# Altium PCB OpenRex_V1I1_PCB.PcbDoc (part 2 of 12)
Units mm, origin at the board's own origin, x right, y up, seen from the top; angles counter-clockwise.
Board outline 70 x 95 mm, 10 copper layers (L1, L2, L3, L4 (PWR), L5 (PWR), L6 (PWR), L7 (PWR), L8, L9, L10), stack 1.632 mm thick; 1080 components, 708 nets, 3831 pads, 2373 vias.
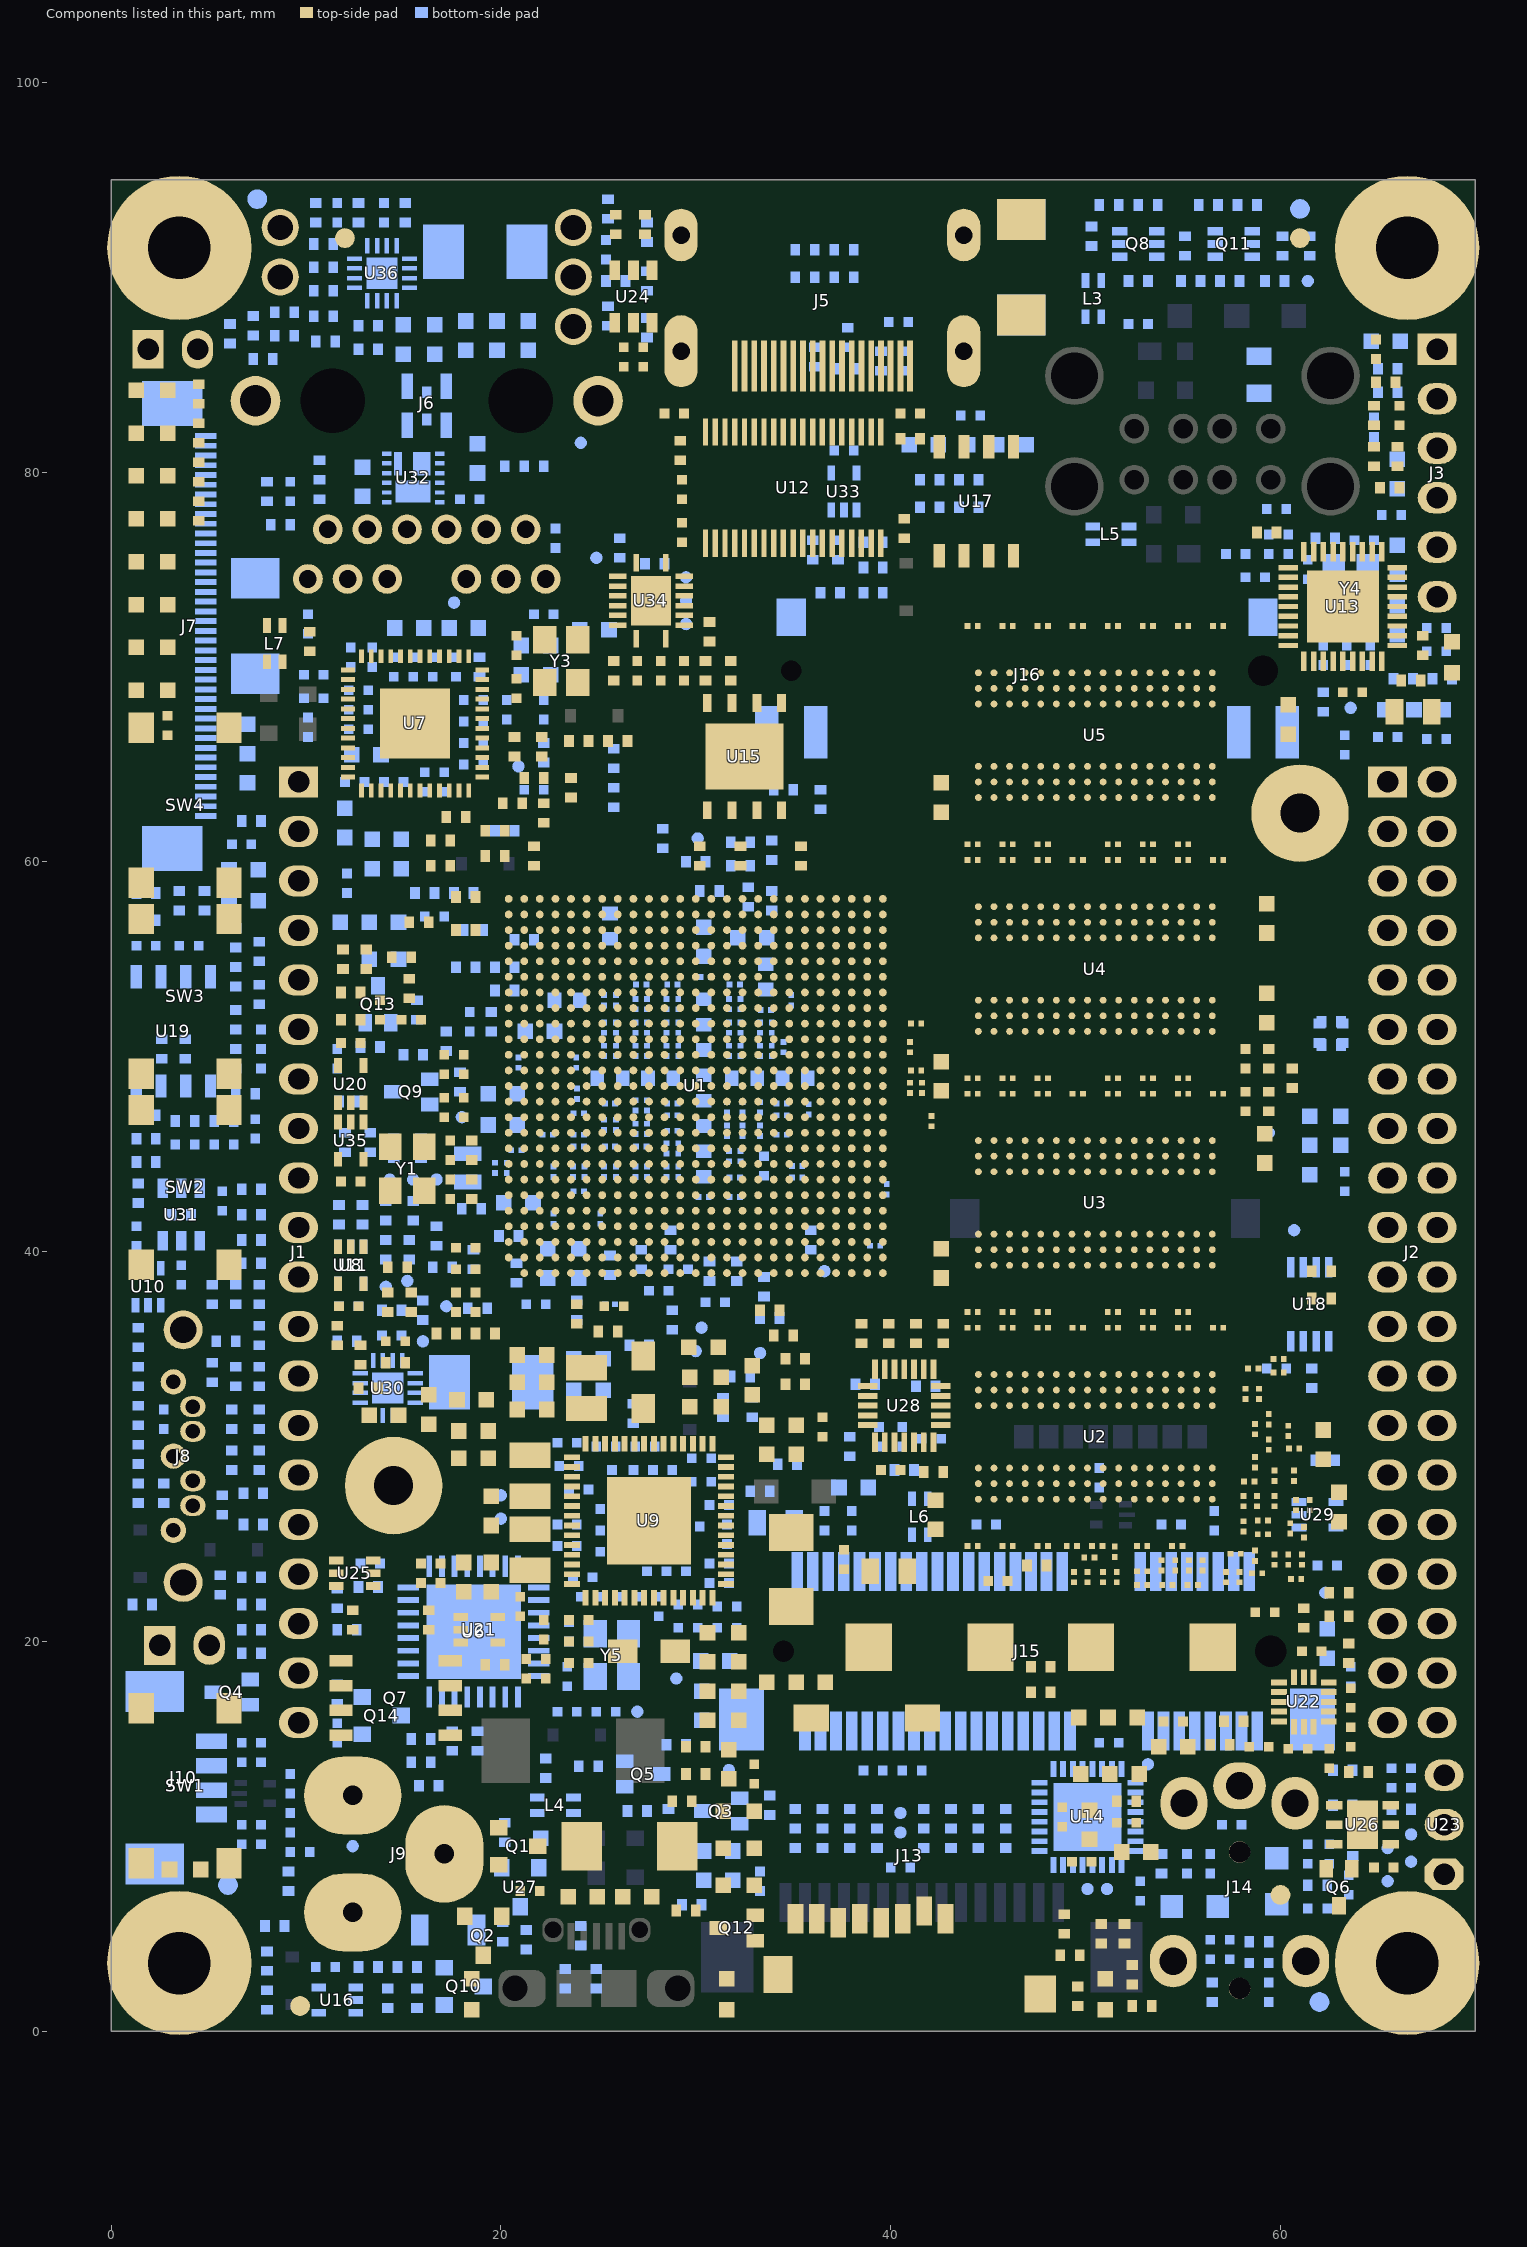
[diagram p10: the components of this part, seen from the top]

## Components (designator, comment, footprint, x,y, rotation, side; value= is the part's Value field where it differs from the comment) (continued)
L7 "ACM2012-900-2P-T002" ACM2012 8.4,71.2 r90 top
L8 "1u / 2.6A" IFSC_79MILX98MIL 24.4,33 r270 top
L9 "1u / 2.6A" IFSC_79MILX98MIL 21.5,28.5 r90 top
L10 "1u / 2.6A" IFSC_79MILX98MIL 21.5,24.7 r270 top
L11 "2u2 / 2.75A" IHLP_160MILX175MIL 34.9,23.7 r90 top
L12 "1u" IHLP_204MILX216MIL 19.5,33.3 r0 bottom locked
L13 "1u" IHLP_204MILX216MIL 19.2,91.3 r0 bottom
MH1 "MH_7.4MMC_3.2MMD" MH_7.4MMD_3.2MMD 3.5,3.5 r0 top locked
MH2 "MH_7.4MMC_3.2MMD" MH_7.4MMD_3.2MMD 66.5,3.5 r0 top locked
MH3 "MH_7.4MMC_3.2MMD" MH_7.4MMD_3.2MMD 66.5,91.5 r0 top locked
MH4 "MH_7.4MMC_3.2MMD" MH_7.4MMD_3.2MMD 3.5,91.5 r0 top locked
MH5 "MH_5MMC_2MMD" MH_5MMD_2MMD 14.5,28 r0 top locked
MH6 "MH_5MMC_2MMD" MH_5MMD_2MMD 61,62.5 r0 top locked
Q1 "DMP2035U-7" SOT-23-3-123 20.9,9.5 r0 top
Q2 "DMP2035U-7" SOT-23-3-123 19.1,4.9 r270 top
Q3 "2N7002BKW,115" SC70_SOT323 31.3,11.3 r180 bottom
Q4 "2N7002BKW,115" SC70_SOT323 6.2,17.4 r180 bottom
Q5 "2N7002BKW,115" SC70_SOT323 27.3,13.2 r0 bottom
Q6 "2N7002BKW,115" SC70_SOT323 63,7.4 r270 top
Q7 "SI4425BDY-T1-E3" 8_SOIC_3.9MM 14.6,17.1 r0 top
Q8 "2N7002BKS,115" SOT363 52.7,91.7 r0 bottom
Q9 "2N7002BKW,115" SC70_SOT323 15.4,48.2 r180 bottom
Q10 "MMBT3906,215" SOT-23-3-123 18.1,2.3 r0 bottom
Q11 "2N7002BKS,115" SOT363 57.6,91.7 r0 bottom
Q12 "2N7002BKW,115" SC70_SOT323 32.1,5.3 r180 top
Q13 "2N7002BKW,115" SC70_SOT323 13.7,52.7 r90 bottom
Q14 "MMBT3906,215" SOT-23-3-123 13.9,16.2 r0 bottom
R1 "47R" R0201 60.4,24.2 r270 top
R2 "47R" R0201 57.9,23.3 r90 top
R3 "47R" R0201 60.7,28.5 r270 top
R4 "240R" R0201 49.6,36.1 r0 top
R5 "240R" R0201 49.6,48.1 r0 top
R6 "10k" R0201 35.8,47.3 r90 bottom
R7 "10k" R0201 39.8,43.2 r270 bottom
R8 "240R" R0201 49.6,60.1 r0 top
R9 "240R" R0201 49.6,72.1 r0 top
R10 "240R" R0201 41.3,51.7 r0 top
R11 "47R" R0201 56,23.9 r270 top
R12 "47R" R0201 59.7,28.5 r270 top
R13 "0R" R0402 23.9,37 r90 bottom
R14 "0R" R0402 20.4,40.8 r0 bottom
R15 "10k" R0402 32.3,61 r0 bottom
R16 "49R9" R0402 19.2,35.8 r180 top
R17 "49R9" R0402 17.2,35.8 r0 top
R18 "0R" R0402 25.6,39.3 r90 bottom
R19 "0R" R0402 19.5,51.8 r270 bottom
R20 "2M2" R0402 18.5,45.2 r90 top
R21 "47k" R0402 39.1,73.8 r0 bottom
R22 "47R" R0201 59.7,24.2 r270 top
R23 "1k6" R0402 36,76 r90 bottom
R24 "0R" R0402 25.5,35.9 r0 top
R25 "0R" R0402 35.1,33.2 r180 top
R26 "0R" R0402 23.9,36.8 r270 top
R27 "0R" R0402 28.7,40.6 r90 bottom
R28 "4k99" R0402 37.9,30 r270 bottom
R29 "0R" R0402 30.7,39 r90 bottom
R30 "1k" R0402 20.7,65.9 r90 top
R31 "47R" R0201 59.1,26.2 r180 top
R32 "1k6" R0201 25.6,37.3 r0 bottom
R33 "0R" R0402 39.3,9.9 r90 bottom
R34 "47R" R0201 52.9,23.6 r0 top
R35 "22R" R0402 21.2,56 r180 bottom
R36 "0R" R0402 35.9,40.6 r90 bottom
R37 "200R" R0402 20.8,38.9 r90 bottom
R38 "47R" R0201 58.7,24.4 r270 top
R39 "47R" R0201 57.2,23.3 r90 top
R40 "47R" R0201 61.2,25.6 r90 top
R41 "0R" R0402 2.6,50.4 r270 bottom
R42 "47R" R0201 52.9,22.9 r0 top
R43 "22R" R0402 21.7,60.3 r90 top
R44 "47R" R0201 59.7,27.2 r90 top
R45 "47R" R0201 51.5,24.6 r270 top
R46 "0R" R0402 29.2,81.1 r90 top
R47 "15k" R0402 41,81.7 r180 top
R48 "10k" R0402 13.3,45.6 r90 bottom
R49 "10k" R0402 15.4,37.4 r270 top
R50 "47R" R0201 59.4,31.4 r270 top
R51 "0R" R0402 14.7,39.2 r180 top
R52 "10k" R0402 48.9,5.5 r270 top
R53 "10k" R0402 49.2,3.9 r180 top
R54 "10k" R0402 50.8,5 r90 top
R55 "4k99" R0201 24,47.1 r0 bottom
R56 "4k99" R0201 22.4,46 r0 bottom
R57 "10k" R0402 32.3,59.8 r180 bottom
R58 "10k" R0402 15.9,45.3 r270 bottom
R59 "10k" R0402 1.4,33.6 r90 bottom
R60 "0R" R0402 51.2,93.7 r180 bottom
R61 "1k" R0201 25.1,41.7 r90 bottom
R62 "10k" R0402 16,37 r270 bottom
R63 "10k" R0402 18.6,39.6 r270 bottom
R64 "10k" R0402 17,39.2 r0 bottom
R65 "0R" R0402 39.3,10.9 r270 bottom
R66 "47R" R0201 59.1,25.5 r180 top
R67 "0R" R0402 47.7,18.7 r180 top
R68 "10k" R0402 11.7,41.9 r90 bottom
R69 "10k" R0402 12.9,41.9 r90 bottom
R70 "0R" R0402 14.2,37.4 r90 top
R71 "0R" R0402 37.9,9.9 r90 bottom
R72 "47R" R0201 58.7,30.9 r270 top
R73 "100k" R0402 7.3,26 r180 bottom
R74 "0R" R0402 33.9,58 r90 bottom
R75 "10k" R0402 24,66.2 r180 top
R76 "0R" R0402 32.1,39 r270 bottom
R77 "47R" R0201 51.6,23.3 r90 top
R78 "0R" R0402 27.2,39.6 r270 bottom
R79 "47R" R0201 59.9,33.8 r180 top
R80 "0R" R0402 18.6,56.5 r180 bottom
R81 "220R" R0402 8,79 r90 bottom
R82 "220R" R0402 25.9,89.8 r0 bottom
R83 "22R" R0402 19.7,61.6 r180 top
R84 "12k1" R0402 18.9,70 r270 bottom
R85 "22R" R0402 20.6,63 r180 top
R86 "22R" R0402 21.7,64.3 r180 top
R87 "4k99" R0402 22.2,62.5 r90 top
R88 "0R" R0402 34.5,63.7 r180 bottom
R89 "4k99" R0402 22.2,65.6 r90 bottom
R90 "22R" R0402 16.7,40.8 r90 bottom
R91 "10k" R0402 18.2,56.5 r180 top
R92 "22R" R0402 18.8,37.1 r180 bottom
R93 "0R" R0402 14.1,42.1 r270 bottom
R94 "10k" R0402 10.2,71.3 r270 top
R95 "10k" R0402 19.7,60.3 r180 top
R96 "10k" R0402 16.9,59.8 r180 top
R97 "10k" R0402 18.2,58.2 r180 top
R98 "10k" R0402 16.9,61.1 r180 top
R99 "191R" R0201 20.9,49.7 r270 bottom
R100 "1k, 1206, 0.5W" R1206 17.3,5.2 r180 bottom
R101 "1k" R0402 17.7,62.3 r0 top
R102 "1k" R0402 8.7,77.3 r180 bottom
R103 "47R" R0201 55.3,23.9 r270 top
R104 "0R" R0402 47.7,17.4 r0 top
R105 "47R" R0201 60.7,29.9 r180 top
R106 "47R" R0201 60.5,25.8 r90 top
R107 "47R" R0201 58.9,32.7 r90 top
R108 "47R" R0201 59.9,34.5 r180 top
R109 "10k" R0402 31.8,69.8 r270 top
R110 "10k" R0402 61.2,21.2 r270 top
R111 "47R" R0201 58.1,25.9 r90 top
R112 "49R9" R0201 50.1,23.3 r270 top
R113 "49R9" R0201 41.6,48.4 r90 top
R114 "10k" R0402 62.1,37.6 r0 top
R115 "10k" R0402 62.1,39 r0 top
R116 "10k" R0402 33.8,36.6 r0 bottom
R117 "0R" R0402 3.8,50.4 r270 bottom
R118 "47k" R0402 39.1,75.1 r0 bottom
R119 "0R" R0402 37.9,10.9 r270 bottom
R120 "0R" R0402 36.5,9.9 r90 bottom
R121 "0R" R0402 36.5,10.9 r270 bottom
R122 "0R" R0402 35.1,9.9 r90 bottom
R123 "0R" R0402 35.1,10.9 r270 bottom
R124 "22R" R0402 28.8,36.5 r270 bottom
R125 "0R" R0402 43.1,9.9 r90 bottom
R126 "0R" R0402 43.1,10.9 r270 bottom
R127 "0R" R0402 41.7,9.9 r90 bottom
R128 "0R" R0402 41.7,10.9 r270 bottom
R129 "0R" R0402 45.9,9.9 r90 bottom
R130 "22R" R0402 35.4,60.3 r90 top
R131 "22R" R0402 30.2,60.3 r90 top
R132 "4k99" R0402 38.7,33.2 r180 bottom
R133 "4k99" R0402 27.5,87.4 r90 bottom
R134 "4k99" R0402 27.5,89.8 r270 bottom
R135 "0R" R0402 45.9,10.9 r270 bottom
R136 "0R" R0402 44.5,9.9 r90 bottom
R137 "4k99" R0402 8.9,88.2 r180 bottom
R138 "0R" R0402 44.5,10.9 r270 bottom
R139 "0R" R0402 34.5,35.7 r180 top
R140 "10k" R0402 2.7,27.6 r90 bottom
R141 "33R" R0402 1.4,29.6 r270 bottom
R142 "4k99" R0402 7.3,87.5 r90 bottom
R143 "10k" R0402 18.2,54.6 r180 bottom
R144 "10k" R0402 11.6,35.7 r90 top
R145 "1k5" R0402 4.5,84 r90 top
R146 "240R" R0402 29.5,6.2 r0 top
R147 "10k" R0402 16.1,58.4 r180 bottom
R148 "4k99" R0402 5.2,33.8 r90 bottom
R149 "33R" R0402 18.1,58.4 r180 bottom
R150 "10k" R0402 29.8,6.5 r0 bottom
R151 "10k" R0402 33.8,37 r180 top
R152 "22R" R0402 20.2,53.4 r180 bottom
R153 "22R" R0402 20.2,54.6 r180 bottom
R154 "0R" R0402 52.4,2.9 r270 top
R155 "0R" R0402 13.2,3.3 r180 bottom
R156 "0R" R0402 52,5 r270 top
R157 "4k99" R0402 36.9,73.8 r0 bottom
R158 "0R" R0402 14.1,40.1 r90 bottom
R159 "10k" R0402 32.7,58.2 r90 bottom
R160 "6k04" R0201 22.7,41.7 r270 bottom
R161 "22R" R0402 18.5,42.2 r180 bottom
R162 "1k" R0402 23.6,63.8 r270 top
R163 "10k" R0402 33.9,60.6 r270 bottom
R164 "10k" R0402 30.7,58.5 r0 bottom
R165 "1k5" R0402 4.5,82 r270 top
R166 "10k" R0402 30,60 r0 bottom
R167 "10M" R0402 18.5,43.2 r270 top
R168 "10M" R0201 19.7,44.3 r90 bottom
R169 "0R" R0402 64.8,80.8 r90 top
R170 "0R" R0402 47.5,23.9 r180 top
R171 "4k99" R0402 17.2,50.8 r90 bottom
R172 "4k99" R0402 14.5,45.3 r90 bottom
R173 "10k" R0402 15.5,50.1 r0 bottom
R174 "10k" R0402 8,1.6 r90 bottom
R175 "10k" R0402 17.9,48.7 r90 bottom
R176 "1k5" R0402 4.5,80 r270 top
R177 "0R" R0402 5.2,37.8 r270 bottom
R178 "0R" R0402 25.8,65.3 r90 bottom
R179 "0R" R0402 25.8,63.3 r270 bottom
R180 "0R" R0402 26,66.2 r0 top
R181 "22R" R0402 22.1,65.9 r270 top
R182 "0R" R0402 37.8,86.9 r270 bottom
R183 "0R" R0402 37.8,85.3 r180 bottom
R184 "0R" R0402 39.5,85.7 r270 bottom
R185 "240R" R0402 49.6,1.8 r270 top
R186 "240R" R0402 24.9,2.7 r90 bottom
R187 "4k99" R0402 40.8,85.7 r90 bottom
R188 "4k99" R0402 36.1,85.9 r90 bottom
R189 "1k5" R0402 4.5,78 r90 top
R190 "27k" R0402 40.7,77.1 r90 top
R191 "10k" R0402 52.9,1.3 r180 top
R192 "1k5" R0402 15.3,53.5 r270 top
R193 "1k5" R0402 14.9,55.1 r0 top
R194 "0R" R0402 16.7,82.7 r180 bottom
R195 "0R" R0402 8.9,87 r0 bottom
R196 "0R" R0402 6.1,87.1 r90 bottom
R197 "10k" R0402 35.1,34.5 r0 top
R198 "10k" R0402 24.1,4.9 r90 bottom
R199 "10k" R0402 23.3,2.7 r90 bottom
R200 "1k5" R0402 4.8,58 r270 bottom
R201 "10k" R0402 33.8,11.6 r270 bottom
R202 "1k5" R0402 3.5,58 r270 bottom
R203 "100k" R0402 7.2,19.4 r180 bottom
R204 "0R" R0402 28.6,10.9 r270 bottom
R205 "4k99" R0402 6.2,31.4 r270 bottom
R206 "22R" R0402 33.5,38.2 r270 bottom
R207 "0R" R0402 15.7,82.7 r180 bottom
R208 "10k" R0402 7.2,40.6 r180 bottom
R209 "10k" R0402 5.9,35.4 r180 bottom
R210 "10k" R0402 7.2,41.9 r0 bottom
R211 "10k" R0402 6.4,33.6 r90 bottom
R212 "10k" R0402 15.8,56.9 r180 top
R213 "10k" R0402 27,11.3 r180 bottom
R214 "100k" R0402 8,3.6 r90 bottom
R215 "100k" R0402 66,80.8 r270 top
R216 "100k" R0402 65.6,79.2 r180 top
R217 "100k" R0402 64.8,82.9 r270 top
R218 "0R" R0402 65.4,84.6 r180 top
R219 "1k" R0402 65.5,84.1 r180 bottom
R220 "100k" R0402 60.1,91.6 r270 bottom
R221 "100k" R0402 61.5,91.6 r270 bottom
R222 "12k" R0402 59.3,76.9 r180 top
R223 "100k" R0402 65.5,85.3 r180 bottom
R224 "100k" R0402 68.3,69.4 r180 bottom
R225 "10k" R0402 15.3,40.1 r90 bottom
R226 "240R" R0402 66.2,11.4 r0 bottom
R227 "0R" R0402 7.2,43.2 r180 bottom
R228 "0R" R0402 7.6,33.6 r90 bottom
R229 "10k" R0402 6.4,37.8 r270 bottom
R230 "15k" R0402 61.9,7.5 r0 bottom
R231 "15k" R0402 58.9,4.6 r180 bottom
R232 "33R" R0402 63.7,9.5 r270 bottom
R233 "33R" R0402 56.5,2 r90 bottom
R234 "0R" R0402 52.1,11.8 r180 top
R235 "2k2" R0402 53.9,8.6 r90 bottom
R236 "0R" R0402 31.4,32 r270 bottom
R237 "47k" R0402 24.5,13.6 r180 bottom
R238 "0R" R0402 63.2,13.4 r180 bottom
R239 "100k" R0402 7.2,21.9 r0 bottom
R240 "10k" R0402 28.3,61.2 r270 bottom
R241 "0R" R0402 57.6,15.9 r180 top
R242 "0R" R0402 56.9,14.7 r180 top
R243 "0R" R0402 64,13.3 r180 top
R244 "10k" R0402 32.3,60.3 r90 top
R245 "240R" R0402 59.4,49.9 r90 top
R246 "60R4" R0402 3.8,46.7 r0 bottom
R247 "0R" R0402 63.2,11.6 r180 bottom
R248 "0R" R0402 6.9,48.1 r0 bottom
R249 "60R4" R0402 5.8,46.7 r0 bottom
R250 "10k" R0402 1.8,47 r0 bottom
R251 "10k" R0402 12.3,53.3 r0 top
R252 "10k" R0402 11.9,55 r270 top
R253 "49R9" R0201 49.4,23.3 r270 top
R254 "33R" R0402 12.3,51.9 r180 top
R255 "33R" R0402 13.1,55 r90 top
R256 "49R9" R0201 41,48.4 r90 top
R257 "4k99" R0402 27.4,92.7 r90 top
R258 "0R" R0402 27.5,92.3 r270 bottom
R259 "0R" R0402 25.9,92.7 r270 top
R260 "100k" R0201 32,42.8 r180 bottom
R261 "100k" R0402 33.3,27.7 r180 bottom
R262 "100k" R0402 5.6,22.9 r270 bottom
R263 "47k" R0402 32.9,32 r90 bottom
R264 "47k" R0402 32.3,33.6 r0 bottom
R265 "10k" R0402 34.7,29.1 r180 bottom
R266 "100k" R0402 27.1,35.2 r0 bottom
R267 "330R" R0402 30,14.6 r0 top
R268 "330R" R0402 30,13.2 r180 top
R269 "330R" R0402 29.3,11.8 r0 top
R270 "10k" R0402 19.7,18.8 r0 top
R271 "0R" R0402 15.5,42.1 r270 bottom
R272 "10k" R0402 1.4,35.6 r270 bottom
R273 "0R" R0402 7.6,31.4 r90 bottom
R274 "240R" R0402 59.4,47.7 r90 top
R275 "22R" R0402 7.2,62.1 r180 bottom
R276 "0R" R0402 6.4,54.1 r90 bottom
R277 "0R" R0402 7.6,55.4 r270 bottom
R278 "0R" R0402 6.4,49.9 r90 bottom
R279 "0R" R0402 6.4,51.9 r270 bottom
R280 "10k" R0402 13.3,50.5 r180 bottom
R281 "0R" R0402 16.3,21.1 r270 top
R282 "0R" R0402 13.2,22.8 r180 bottom
R283 "10k" R0402 66.7,69.3 r180 top
R284 "10k" R0402 67.3,71.1 r90 top
R285 "10k" R0402 62.2,68.2 r270 bottom
R286 "10k" R0402 66.3,69.4 r0 bottom
R287 "0R" R0402 25.5,88 r90 bottom
R288 "0R" R0402 25.5,93.5 r270 bottom
R289 "10k" R0402 12.4,21.1 r90 top
R290 "4k99" R0402 6.4,56.1 r90 bottom
R291 "4k99" R0402 7.6,53.2 r90 bottom
R292 "11k8" R0402 20.2,10.2 r90 bottom
R293 "10k" R0402 15.7,1.7 r270 bottom
R294 "0R" R0805_SMALL 16.2,82.4 r180 bottom
R295 "0R" R0805_SMALL 16.2,84.4 r0 bottom
R296 "10k5" R0402 21.3,4.7 r90 bottom
R297 "0R" R0402 16.7,84.1 r180 bottom
R298 "0R" R0402 15.7,84.1 r180 bottom
R299 "33R" R0402 18.8,14.9 r270 bottom
R300 "33R" R0402 17.5,14.9 r270 bottom
R301 "470k" R0402 20.1,5.1 r270 bottom
R302 "4k99" R0402 1.4,43 r270 bottom
R303 "10k" R0402 1.8,44.6 r0 bottom
R304 "0R" R0402 15.2,3.3 r0 bottom
R305 "10k" R0402 14.2,1.7 r90 bottom
R306 "240R" R0201 51.4,36.1 r0 top
R307 "240R" R0201 51.4,48.1 r0 top
R308 "240R" R0201 51.4,60.1 r0 top
R309 "240R" R0201 51.4,72.1 r0 top
R310 "10k" R0402 62.3,29.3 r180 bottom
R311 "0R" R0402 63.5,19.4 r90 top
R312 "10k" R0402 42.7,35.8 r270 top
R313 "0R" R0402 41.3,35.8 r90 top
R314 "0R" R0402 39.9,35.8 r90 top
R315 "10k" R0402 63,21.3 r180 top
R316 "0R" R0402 63,22.5 r180 top
R317 "10k" R0402 42.2,28.7 r180 top
R318 "0R" R0402 61.6,33.5 r270 bottom
R319 "10k" R0402 25.8,69.8 r90 top
R320 "0R" R0402 40.7,28.8 r0 bottom
R321 "0R" R0402 44,79.6 r0 bottom
R322 "0R" R0402 43,79.6 r180 bottom
R323 "0R" R0402 42,79.6 r0 bottom
R324 "0R" R0402 44,78.2 r0 bottom
R325 "0R" R0402 43,78.2 r180 bottom
R326 "0R" R0402 42,78.2 r0 bottom
R327 "0R" R0402 35.6,91.4 r180 bottom
R328 "0R" R0402 36.6,91.4 r0 bottom
R329 "0R" R0402 37.6,91.4 r180 bottom
R330 "0R" R0402 35.6,90 r180 bottom
R331 "0R" R0402 36.6,90 r0 bottom
R332 "0R" R0402 37.6,90 r180 bottom
R333 "0R" R0402 7.6,37.8 r270 bottom
R334 "0R" R0402 6.2,29.3 r270 bottom
R335 "10k" R0402 5.7,27 r270 bottom
R336 "82k" R0402 14.6,34.3 r0 top
R337 "150k" R0402 7.6,29.3 r90 bottom
R338 "100k" R0402 7.3,27.6 r180 bottom
R339 "63k4" R0402 12.8,34.7 r90 top
R340 "0R" R0402 26.8,31.7 r90 bottom
R341 "0R" R0402 21.3,29.8 r0 bottom
R342 "0R" R0402 13.2,33 r180 top
R343 "0R" R0402 12.1,35.4 r0 bottom
R344 "100k" R0402 14.4,37 r0 bottom
R345 "0R" R0402 60.6,48.9 r270 top
R346 "1k" R0402 36.4,63.2 r270 bottom
R347 "100k" R0402 1.4,27.6 r270 bottom
R348 "0R" R0402 1.4,31.6 r90 bottom
R350 "0R" R0402 3.6,41.9 r180 bottom
R351 "0R" R0402 7.6,35.7 r90 bottom
R352 "0R" R0402 20.7,80.3 r0 bottom
R353 "0R" R0402 21.7,80.3 r0 bottom
R354 "0R" R0402 10.7,79.1 r90 bottom
R355 "0R" R0402 10.7,80.1 r270 bottom
R356 "47k" R0402 39.1,76.4 r0 bottom
R357 "0R" R0402 37.3,76 r270 bottom
R358 "1M" R0402 62.3,76.6 r180 bottom
R359 "10k" R0402 30.7,71.8 r270 top
R360 "10k" R0402 30.5,69.8 r270 top
R361 "0R" R0402 27.9,72.5 r0 bottom
R362 "0R" R0402 27.9,73.7 r0 bottom
R363 "0R" R0402 26.1,76.1 r270 bottom
R364 "0R" R0402 27.9,75.3 r0 bottom
R365 "100k" R0402 7.2,20.6 r180 bottom
R366 "0R" R0402 63.2,51.2 r90 bottom
R367 "0R" R0402 62.6,50.6 r180 bottom
R368 "0R" R0402 62.6,51.8 r0 bottom
R369 "0R" R0402 62,51.2 r270 bottom
R370 "3k3" R0402 50.3,92.1 r90 bottom
R371 "3k3" R0402 58.3,93.7 r0 bottom
R372 "3k3" R0402 55.1,91.6 r270 bottom
R373 "0R" R0402 52.7,89.8 r0 bottom
R374 "0R" R0402 56.3,93.7 r180 bottom
R375 "3k3" R0402 53.2,93.7 r0 bottom
R376 "3k3" R0402 55.4,89.8 r180 bottom
R377 "3k3" R0402 59.7,89.8 r0 bottom
R378 "0R" R0402 57.4,89.8 r0 bottom
R379 "240R" R0402 8.4,5.4 r0 bottom
R380 "10k" R0402 7.2,23.3 r0 bottom
R381 "10k" R0402 20.2,61.6 r0 bottom
R382 "10k" R0402 1.8,45.8 r180 bottom
R383 "10k" R0402 41.8,33.1 r0 bottom
R384 "0R" R0402 24.1,31.6 r0 bottom
R385 "100k" R0402 29,14.7 r0 bottom
R386 "24k" R0402 15.9,15 r180 bottom
R387 "1k5" R0402 16.3,12.6 r0 bottom
R388 "3k" R0402 15.9,13.8 r180 bottom
R389 "0R" R0402 1.6,21.9 r0 bottom
R390 "0R" R0402 1.8,57 r0 bottom
R391 "0R" R0402 22.3,13.5 r270 bottom
R392 "0R" R0402 1.8,58.4 r0 bottom
R393 "100k" R0402 9.1,7.7 r90 bottom
R394 "100k" R0402 12.1,20.6 r180 bottom
R395 "100k" R0402 11.6,22.2 r270 bottom
R396 "100k" R0402 11.6,17.3 r270 bottom
R397 "0R" R0402 10.9,89.3 r180 bottom
R398 "10k" R0402 13.2,87.5 r180 bottom
R399 "390k" R0402 15.1,93.3 r90 bottom
R400 "150k" R0402 10.9,88 r0 bottom
R401 "100k" R0402 13.2,86.3 r0 bottom
R402 "86k6" R0402 12.7,93.3 r270 bottom
R403 "47k" R0402 11,86.7 r180 bottom
R404 "0R" R0402 7.8,85.8 r180 bottom
R405 "10k" R0402 7.2,39.4 r0 bottom
R406 "0R" R0402 10.9,90.5 r0 bottom
R407 "0R" R0402 10.9,91.7 r0 bottom
R408 "100k" R0402 10.5,93.3 r90 bottom
R410 "10k" R0402 38.5,35.8 r270 top
R411 "0R" R0402 12,45.6 r270 bottom
R412 "0R" R0402 12.2,47.7 r180 bottom
R413 "0R" R0402 15.7,52.4 r90 bottom
SW1 "PTS645SH50SMTR92 LFS" TACT_SMD 3.8,12.6 r270 top
SW2 "PTS645SH50SMTR92 LFS" TACT_SMD 3.8,43.3 r270 top
SW3 "PTS645SH50SMTR92 LFS" TACT_SMD 3.8,53.1 r270 top locked
SW4 "PTS645SH50SMTR92 LFS" TACT_SMD 3.8,62.9 r270 top locked
TP1 "TP_25MILC" TP_25C 14.1,38.2 r90 bottom
TP2 "TP_25MILC" TP_25C 15.5,43.7 r90 bottom
TP3 "TP_25MILC" TP_25C 14.3,43.7 r90 bottom
TP4 "TP_25MILC" TP_25C 23.55,8.6 r90 bottom
TP5 "TP_25MILC" TP_25C 15.2,38.5 r90 bottom
TP6 "TP_25MILC" TP_25C 66.7,10.1 r270 bottom
TP7 "TP_25MILC" TP_25C 50.1,7.3 r90 bottom
TP8 "TP_25MILC" TP_25C 30,34.9 r270 bottom
TP9 "TP_25MILC" TP_25C 17.6,73.3 r90 bottom
TP10 "TP_25MILC" TP_25C 31.7,13.4 r270 bottom
TP11 "TP_25MILC" TP_25C 16,35.4 r270 bottom
TP12 "TP_25MILC" TP_25C 17.2,37.2 r90 bottom
TP13 "TP_25MILC" TP_25C 16.7,43.7 r90 bottom
TP14 "TP_25MILC" TP_25C 62.3,22.5 r90 bottom
TP15 "TP_25MILC" TP_25C 60.7,41.1 r270 bottom
TP16 "TP_25MILC" TP_25C 63.6,67.9 r90 bottom
TP17 "TP_25MILC" TP_25C 65.5,7.7 r270 bottom
TP18 "TP_25MILC" TP_25C 65.5,9.4 r270 bottom
TP19 "TP_25MILC" TP_25C 40.5,11.2 r90 bottom
TP20 "TP_25MILC" TP_25C 40.5,10.2 r90 bottom
TP21 "TP_25MILC" TP_25C 66.7,8.7 r270 bottom
TP22 "TP_25MILC" TP_25C 29.5,73.4 r90 bottom
TP23 "TP_25MILC" TP_25C 24.9,75.6 r90 bottom
TP24 "TP_25MILC" TP_25C 29.5,72.2 r90 bottom
TP25 "TP_25MILC" TP_25C 29.5,74.6 r90 bottom
TP26 "TP_25MILC" TP_25C 18,46.9 r90 bottom
TP27 "TP_25MILC" TP_25C 20.9,64.9 r90 bottom
TP28 "TP_25MILC" TP_25C 30.1,61.2 r90 bottom
TP29 "TP_25MILC" TP_25C 20,26.3 r90 bottom
TP30 "TP_25MILC" TP_25C 20,27.5 r90 bottom
TP31 "TP_25MILC" TP_25C 30.3,36.1 r90 bottom
TP32 "TP_25MILC" TP_25C 59.4,46.1 r90 bottom
TP33 "TP_25MILC" TP_25C 24.1,81.5 r90 bottom
TP34 "TP_25MILC" TP_25C 53.2,13.7 r90 bottom
TP35 "TP_25MILC" TP_25C 36.6,39 r90 bottom
TP36 "TP_25MILC" TP_25C 27,16.4 r90 bottom
TP37 "TP_25MILC" TP_25C 33.3,34.8 r90 bottom
TP38 "TP_25MILC" TP_25C 29,18.1 r180 bottom
TP39 "TP_25MILC" TP_25C 12.4,9.5 r90 bottom
TP40 "TP_25MILC" TP_25C 61.4,89.8 r90 bottom
TP41 "TP_25MILC" TP_25C 51.1,7.3 r90 bottom
U1 "MCIMX6Q5EYM10AC_v.ORX" PBGA624 30,48.5 r90 top locked
U2 "MT41J256M16HA-125:E" 96_FPGA_DD3_14MMX10MM-SMALL_SIZE 50.5,30.5 r90 top locked
U3 "MT41J256M16HA-125:E" 96_FPGA_DD3_14MMX10MM-SMALL_SIZE 50.5,42.5 r90 top locked
U4 "MT41J256M16HA-125:E" 96_FPGA_DD3_14MMX10MM-SMALL_SIZE 50.5,54.5 r90 top locked
U5 "MT41J256M16HA-125:E" 96_FPGA_DD3_14MMX10MM-SMALL_SIZE 50.5,66.5 r90 top locked
U6 "LPC1345FHN33,551-ND" HVQFN33_7X7MM 18.6,20.5 r180 bottom
U7 "KSZ9031RNXIA" QFN48_SMALL_EP_7MMX7MM 15.6,67.1 r270 top locked
U8 "SN74AHC1G09DCKR" SC70_5 12.3,39.3 r270 bottom
U9 "MMPF0100NPAEP" "56-VFQFN EP" 27.6,26.2 r270 top locked
U10 "SN74AHC1G09DCKR" SC70_5 1.9,38.2 r90 bottom
U11 "SN74LVC1G08DCKR" SC70_5 12.3,39.3 r270 top
U12 "CM2020-00TR" TSSOP_38 35,79.2 r90 top locked
U13 "USB2514BI-AEZG" QFN36_6MMX6MM 63.2,73.1 r0 top locked
U14 "SGTL5000XNAA3R2" "QFN32 5x5x0.85_V1.1" 50.1,11 r180 bottom
U15 "SST26VF032B-104I/MF" WSON8_6X5MM 32.5,65.4 r90 top
U16 "M74VHC1GT126DF1G" SC70_5 11.6,1.6 r180 bottom
U17 "MIC2026-1YM TR" 8_SOIC_3.9MM 44.4,78.5 r90 top locked
U18 "BR24L02FVM-WTR" "MSOP8 _SMALLER" 61.5,37.3 r270 bottom
U19 "TJA1040T" 8_SOIC_3.9MM 3.2,51.3 r270 bottom
U20 "SN74LVC1G08DCKR" SC70_5 12.3,48.6 r90 top
U21 "SN74AHC1G09DCKR" SC70_5 18.9,20.6 r0 top
U22 "FXOS8700CQR1" QFN16_3X3MM 61.2,16.9 r180 top locked
U23 "TSOP38238" TSOP382 68.4,8.06 r180 top locked
U24 "TMP101NA" SOT23-6_DBV6 26.8,89 r270 top
U25 "TS5A3157DCKR" SC70_6 12.5,23.5 r0 top
U26 "SHT21" 6_DFN_3MMX3MM 64.2,10.6 r0 top
U27 "TL431AQDBZR" SOT-23-3-123 21,7.4 r270 bottom
U28 "FXAS21002CQR1" QFN24_4X4MM 40.7,32.1 r270 top
U29 "SN74LVC1G14DCKR" SC70_5 61.9,26.5 r0 bottom
U30 "ISL8024AIRTAJZ-T7A" 16-TQFN_3mmx3mm_V1.1 14.2,33 r90 bottom
U31 "TPS3808G09DBVRG4" DBV_SOT_23_6 3.6,41.9 r90 bottom
U32 "MIC33050-4YHL TR" MLF_3X3_12PINS 15.5,79.7 r0 bottom
U33 "SN74LVC1G17DCKR" SC70_5 37.6,79 r90 bottom
U34 "SN74AVC4T245RGYR" "RGY (R-PVQFN-N16)" 27.7,73.4 r90 top
U35 "SN74LVC1G08DCKR" SC70_5 12.3,45.7 r270 top
U36 "ISL8024AIRTAJZ-T7A" 16-TQFN_3mmx3mm_V1.1 13.9,90.2 r90 bottom
Y1 "24MHz" ABM8 15.2,44.25 r90 top
Y2 "32.768kHz" ABS06 18.3,44.3 r90 bottom
Y3 "25.000MHz" ABM8G 23.1,70.3 r90 top
Y4 "24MHz" ABM8 63.6,74 r270 bottom
Y5 "7M-12.000MAHE-T" 7M 25.7,19.3 r270 bottom

## Footprints (in the part's own frame and the unit in brackets; to place one, negate y for a bottom-side part, rotate by r counter-clockwise, add the part's x,y. Pads: shape width x height; smd on the part's side, far side on the other; paste and mask are expansions set on the pad)
4-1734592-0 [mm] "Creator MM"
  rect 0.3x1.1 smd mask+0.025: 1(-9.75,0.85) 2(-9.25,0.85) 3(-8.75,0.85) 4(-8.25,0.85) 5(-7.75,0.85) 6(-7.25,0.85) 7(-6.75,0.85) 8(-6.25,0.85) 9(-5.75,0.85) 10(-5.25,0.85) 11(-4.75,0.85) 12(-4.25,0.85) 13(-3.75,0.85) 14(-3.25,0.85) 15(-2.75,0.85) 16(-2.25,0.85) 17(-1.75,0.85) 18(-1.25,0.85) 19(-0.75,0.85) 20(-0.25,0.85) 21(0.25,0.85) 22(0.75,0.85) 23(1.25,0.85) 24(1.75,0.85) 25(2.25,0.85) 26(2.75,0.85) 27(3.25,0.85) 28(3.75,0.85) 29(4.25,0.85) 30(4.75,0.85) 31(5.25,0.85) 32(5.75,0.85) 33(6.25,0.85) 34(6.75,0.85) 35(7.25,0.85) 36(7.75,0.85) 37(8.25,0.85) 38(8.75,0.85) 39(9.25,0.85) 40(9.75,0.85)
  rect 2.3x3.1 smd mask+0.076: 41(-11.42,-0.85) 42(11.42,-0.85)
  silkscreen extent -12.9,-5.2 12.9,-2.6, body extent -12.72,-3.96 12.71,1.15, height 2.05
6_DFN_3MMX3MM [mm] "Creator MM"
  rect 0.85x0.45 smd mask+0.045: 1(-1.45,1) 2(-1.45,0) 3(-1.45,-1) 4(1.45,-1) 5(1.45,0) 6(1.45,1)
  rect 1.6x2.5 smd mask+0.045: 7(0,0)
  silkscreen extent -2.05,-1.6 1.6,1.75, body extent -1.51,-1.5 1.51,1.5, height 1.13
7M [mm] "Creator MM"
  rect 1.4x1.2 smd mask+0.1: 1(-1.1,-0.85) 2(1.1,-0.85) 3(1.1,0.85) 4(-1.1,0.85)
  silkscreen extent -2.35,-1.4 0.1,1.4, body extent -1.65,-1.3 1.65,1.3, height 0.8
8_SOIC_3.9MM [mm]
  rect 1.2x0.58 smd: 1(-2.8,1.905) 2(-2.8,0.635) 3(-2.8,-0.635) 4(-2.8,-1.905) 5(2.8,-1.905) 6(2.8,-0.635) 7(2.8,0.635) 8(2.8,1.905)
  silkscreen extent -1.91,-2.54 1.91,2.54, body extent -3,-2.45 3,2.45, height 1.75
16-TQFN_3mmx3mm_V1.1 [mm] "Shortend length of pads."
  rect 0.78x0.23 smd mask+0.03: 1(-1.41,0.75) 2(-1.41,0.25) 3(-1.41,-0.25) 4(-1.41,-0.75) 9(1.41,-0.75) 10(1.41,-0.25) 11(1.41,0.25) 12(1.41,0.75)
  rect 0.23x0.78 smd mask+0.03: 5(-0.75,-1.41) 6(-0.25,-1.41) 7(0.25,-1.41) 8(0.75,-1.41) 13(0.75,1.41) 14(0.25,1.41) 15(-0.25,1.41) 16(-0.75,1.41)
  rect 1.6x1.6 smd mask+0.03: 17(0,0)
  silkscreen extent -1.6,-1.6 1.6,1.6, body extent -1.5,-1.5 1.5,1.5, height 0.9
"56-VFQFN EP" [mm] "Creator MM"
  rect 0.8x0.3 smd mask+0.03: 1(-3.95,3.25) 2(-3.95,2.75) 3(-3.95,2.25) 4(-3.95,1.75) 5(-3.95,1.25) 6(-3.95,0.75) 7(-3.95,0.25) 8(-3.95,-0.25) 9(-3.95,-0.75) 10(-3.95,-1.25) 11(-3.95,-1.75) 12(-3.95,-2.25) 13(-3.95,-2.75) 14(-3.95,-3.25) 29(3.95,-3.25) 30(3.95,-2.75) 31(3.95,-2.25) 32(3.95,-1.75) 33(3.95,-1.25) 34(3.95,-0.75) 35(3.95,-0.25) 36(3.95,0.25) 37(3.95,0.75) 38(3.95,1.25) 39(3.95,1.75) 40(3.95,2.25) 41(3.95,2.75) 42(3.95,3.25)
  rect 0.3x0.8 smd mask+0.03: 15(-3.25,-3.95) 16(-2.75,-3.95) 17(-2.25,-3.95) 18(-1.75,-3.95) 19(-1.25,-3.95) 20(-0.75,-3.95) 21(-0.25,-3.95) 22(0.25,-3.95) 23(0.75,-3.95) 24(1.25,-3.95) 25(1.75,-3.95) 26(2.25,-3.95) 27(2.75,-3.95) 28(3.25,-3.95) 43(3.25,3.95) 44(2.75,3.95) 45(2.25,3.95) 46(1.75,3.95) 47(1.25,3.95) 48(0.75,3.95) 49(0.25,3.95) 50(-0.25,3.95) 51(-0.75,3.95) 52(-1.25,3.95) 53(-1.75,3.95) 54(-2.25,3.95) 55(-2.75,3.95) 56(-3.25,3.95)
  rect 4.5x4.3 smd paste-10 mask+0.03: 57(0,0)
  silkscreen extent -4.1,-4.1 4.1,4.1, body extent -4,-4 4,4, height 0.9
96_FPGA_DD3_14MMX10MM-SMALL_SIZE [mm] "Creator MM"
  round 0.35 smd mask+0.05: A1(-3.2,6) A2(-2.4,6) A3(-1.6,6) A7(1.6,6) A8(2.4,6) A9(3.2,6) B1(-3.2,5.2) B2(-2.4,5.2) B3(-1.6,5.2) B7(1.6,5.2) B8(2.4,5.2) B9(3.2,5.2) C1(-3.2,4.4) C2(-2.4,4.4) C3(-1.6,4.4) C7(1.6,4.4) C8(2.4,4.4) C9(3.2,4.4) D1(-3.2,3.6) D2(-2.4,3.6) D3(-1.6,3.6) D7(1.6,3.6) D8(2.4,3.6) D9(3.2,3.6) E1(-3.2,2.8) E2(-2.4,2.8) E3(-1.6,2.8) E7(1.6,2.8) E8(2.4,2.8) E9(3.2,2.8) F1(-3.2,2) F2(-2.4,2) F3(-1.6,2) F7(1.6,2) F8(2.4,2) F9(3.2,2) G1(-3.2,1.2) G2(-2.4,1.2) G3(-1.6,1.2) G7(1.6,1.2) G8(2.4,1.2) G9(3.2,1.2) H1(-3.2,0.4) H2(-2.4,0.4) H3(-1.6,0.4) H7(1.6,0.4) H8(2.4,0.4) H9(3.2,0.4) J1(-3.2,-0.4) J2(-2.4,-0.4) J3(-1.6,-0.4) J7(1.6,-0.4) J8(2.4,-0.4) J9(3.2,-0.4) K1(-3.2,-1.2) K2(-2.4,-1.2) K3(-1.6,-1.2) K7(1.6,-1.2) K8(2.4,-1.2) K9(3.2,-1.2) L1(-3.2,-2) L2(-2.4,-2) L3(-1.6,-2) L7(1.6,-2) L8(2.4,-2) L9(3.2,-2) M1(-3.2,-2.8) M2(-2.4,-2.8) M3(-1.6,-2.8) M7(1.6,-2.8) M8(2.4,-2.8) M9(3.2,-2.8) N1(-3.2,-3.6) N2(-2.4,-3.6) N3(-1.6,-3.6) N7(1.6,-3.6) N8(2.4,-3.6) N9(3.2,-3.6) P1(-3.2,-4.4) P2(-2.4,-4.4) P3(-1.6,-4.4) P7(1.6,-4.4) P8(2.4,-4.4) P9(3.2,-4.4) R1(-3.2,-5.2) R2(-2.4,-5.2) R3(-1.6,-5.2) R7(1.6,-5.2) R8(2.4,-5.2) R9(3.2,-5.2) T1(-3.2,-6) T2(-2.4,-6) T3(-1.6,-6) T7(1.6,-6) T8(2.4,-6) T9(3.2,-6)
  silkscreen extent -5.1,-7.1 5.1,7.1, body extent -5,-7 5,7, height 1.2
0532610471 [mm] "Creator MM"
  rect 1.6x0.8 smd mask+0.06: 1(-1.45,-1.875) 2(-1.45,-0.625) 3(-1.45,0.625) 4(-1.45,1.875)
  rect 3x2.1 smd mask+0.06: 5(1.45,-4.425) 6(1.45,4.425)
  silkscreen extent -1.4,-3.5 3.7,3.5, body extent -1.6,-5.08 3.6,5.07, height 3.39
693071010811 [mm]
  rect 0.8x1.5 smd mask+0.09: 1(-1.815,3.225) 2(-0.715,2.825) 3(0.385,3.225) 4(1.485,3.425) 5(2.585,3.225) 6(3.685,3.425) 7(4.785,3.225) 8(5.885,3.225)
  rect 1.8x1.4 smd: 9(-0.625,-7.075) 10(5.075,-7.075)
  rect 1.5x1.9 smd: 11(6.775,6.075)
  rect 1.6x1.9 smd: 12(-6.675,7.075)
  silkscreen extent -7.07,-7.57 7.22,9.6, body extent -6.87,-7.46 7.13,7.75, height 1.83
ABM8 [mm] "Creator MM"
  rect 1.35x1.15 smd mask+0.1: 1(-1.125,-0.875) 2(1.125,-0.875) 3(1.125,0.875) 4(-1.125,0.875)
  silkscreen extent -2.35,-1.4 0.1,1.4, body extent -1.6,-1.25 1.6,1.25, height 0.76
ABM8G [mm] "Creator MM"
  rect 1.4x1.2 smd mask+0.1: 1(-1.1,-0.85) 2(1.1,-0.85) 3(1.1,0.85) 4(-1.1,0.85)
  silkscreen extent -1.9,-1.9 0.1,1.4, body extent -1.6,-1.25 1.6,1.25, height 1.02
ABS06 [mm]
  rect 0.75x1.4 smd: 1(-0.725,0) 2(0.725,0)
  silkscreen extent -1.4,-1 1.4,1, body extent -1,-0.62 1,0.6, height 0.61
ACM2012 [mm]
  rect 0.75x0.4 smd mask+0.076: 1(-0.925,0.4) 2(-0.925,-0.4) 3(0.925,-0.4) 4(0.925,0.4)
  silkscreen extent -1.1,-0.9 1.1,0.9, body extent -1.2,-0.7 1.2,0.7, height 1.3
C0201 [mm] "Creator MM"
  rect 0.3x0.3 smd mask+0.04: 1(-0.265,0) 2(0.265,0)
  silkscreen extent -0.6,-0.3 0.6,0.3, body extent -0.3,-0.15 0.3,0.15, height 0.3
C0402 [mm]
  rect 0.5x0.5 smd: 1(-0.5,0) 2(0.5,0)
  silkscreen extent -1,-0.5 1,0.5, body extent -0.5,-0.25 0.5,0.25, height 0.56
C0603 [mm]
  rect 0.8x0.8 smd: 1(-0.75,0) 2(0.75,0)
  silkscreen extent -1.4,-0.7 1.4,0.7, body extent -0.8,-0.42 0.8,0.44, height 0.95
C0603_small [mm] "Creator MM"
  rect 0.7x0.8 smd: 1(-0.65,0) 2(0.65,0)
  silkscreen extent -1.3,-0.7 1.3,0.7, body extent -0.8,-0.42 0.8,0.44, height 0.95
C0805 [mm]
  rect 0.9x1.3 smd: 1(-0.95,0) 2(0.95,0)
  silkscreen extent -1.78,-1.02 1.78,1.02, body extent -1,-0.6 1,0.6, height 1.5
"C1206 -  TLN S CASE TANTAL" [mm] "Creator MM"
  rect 1.15x1.2 smd: 1(-1.175,0) 2(1.175,0)
  silkscreen extent -2.29,-1.14 2.29,1.14, body extent -1.6,-0.8 1.6,0.8, height 1.21
C2312 [mm] "Creator MM. Footprint density lvl B"
  rect 2.1x2.5 smd mask+0.09: 1(-2.45,0) 2(2.45,0)
  silkscreen extent -4.07,-1.7 3.8,1.7, body extent -3.09,-1.61 3.09,1.6, height 2.7
C2917 [mm] "Creator MM. Footprint density lvl B"
  rect 2.37x2.43 smd: 1(-3.12,0) 2(3.12,0)
  silkscreen extent -4.64,-2.65 4.65,2.65, body extent -3.79,-2.3 3.81,2.3, height 3.1
DBV_SOT_23_6 [mm]
  rect 1x0.55 smd: 1(-1.35,0.95) 2(-1.35,0) 3(-1.35,-0.95) 4(1.35,-0.95) 5(1.35,0) 6(1.35,0.95)
  silkscreen extent -2,-1.59 0.9,1.74, body extent -1.59,-1.59 1.59,1.59, height 1.45
ESQ-120-14-G-D [mm] "Creator MM"
  rect 2x1.6 hole 1.1: 1(0,0)
  oval 2x1.6 hole 1.1: 2(-2.54,0) 3(0,-2.54) 4(-2.54,-2.54) 5(0,-5.08) 6(-2.54,-5.08) 7(0,-7.62) 8(-2.54,-7.62) 9(0,-10.16) 10(-2.54,-10.16) 11(0,-12.7) 12(-2.54,-12.7) 13(0,-15.24) 14(-2.54,-15.24) 15(0,-17.78) 16(-2.54,-17.78) 17(0,-20.32) 18(-2.54,-20.32) 19(0,-22.86) 20(-2.54,-22.86) 21(0,-25.4) 22(-2.54,-25.4) 23(0,-27.94) 24(-2.54,-27.94) 25(0,-30.48) 26(-2.54,-30.48) 27(0,-33.02) 28(-2.54,-33.02) 29(0,-35.56) 30(-2.54,-35.56) 31(0,-38.1) 32(-2.54,-38.1) 33(0,-40.64) 34(-2.54,-40.64) 35(0,-43.18) 36(-2.54,-43.18) 37(0,-45.72) 38(-2.54,-45.72) 39(0,-48.26) 40(-2.54,-48.26)
  silkscreen extent -3.84,-49.93 1.3,1.67, body extent -3.81,-49.78 1.27,1.52, height 12.11
ESQ-120-14-G-S [mm] "Creator MM"
  rect 2x1.6 hole 1.1: 1(0,0)
  oval 2x1.6 hole 1.1: 2(0,-2.54) 3(0,-5.08) 4(0,-7.62) 5(0,-10.16) 6(0,-12.7) 7(0,-15.24) 8(0,-17.78) 9(0,-20.32) 10(0,-22.86) 11(0,-25.4) 12(0,-27.94) 13(0,-30.48) 14(0,-33.02) 15(0,-35.56) 16(0,-38.1) 17(0,-40.64) 18(0,-43.18) 19(0,-45.72) 20(0,-48.26)
  silkscreen extent -1.3,-49.93 1.3,1.67, body extent -1.27,-49.78 1.27,1.52, height 11.11
FC68125 [mm]
  oval 2.4x2.7 hole 1.4: 1(0,0)
  oval 2.7x2.4 hole 1.4: 2(-0.9,-2.85) 3(-9,3.4) 4(-9,-3.4) 6(-0.9,2.85)
  round 1.1 hole 1.1 unplated: 5(-10.4,0) 7(-3.4,0)
  silkscreen extent -15,-3.7 0.3,3.7, body extent -14.88,-3.6 0.2,3.6, height 6
FID_40X52D#1 [mm]
  round 1.016 smd paste-1.016 mask+0.15: 1(-0.3,0.3)
FID_40X52D#2 [mm]
  round 1.016 smd paste-1.016 mask+0.15: 1(0,0)
FID_40X52D#3 [mm]
  round 1.016 smd paste-1.016 mask+0.15: 1(0,0.5)
"HDMI V1.1" [mm] "Changed holes to slots"
  rect 2.6x0.3 smd mask+0.025: 1(-3.36,4.5) 2(-3.36,4) 3(-3.36,3.5) 4(-3.36,3) 5(-3.36,2.5) 6(-3.36,2) 7(-3.36,1.5) 8(-3.36,1) 9(-3.36,0.5) 10(-3.36,0) 11(-3.36,-0.5) 12(-3.36,-1) 13(-3.36,-1.5) 14(-3.36,-2) 15(-3.36,-2.5) 16(-3.36,-3) 17(-3.36,-3.5) 18(-3.36,-4) 19(-3.36,-4.5)
  oval 3.7x1.7 hole 0.9 slot 2.7 at 0 deg: MTG1(-2.6,7.25) MTG3(-2.6,-7.25)
  oval 2.7x1.7 hole 0.9 slot 1.7 at 0 deg: MTG2(3.36,7.25) MTG4(3.36,-7.25)
  silkscreen extent -5.1,-10 12.05,10, body extent -4.2,-7.5 7.95,7.5, height 6.28
HDR_1X2_2.54MM [mm]
  rect 2x1.6 hole 1.1: 1(0,0)
  oval 2x1.6 hole 1.1: 2(0,-2.54)
  silkscreen extent -1.3,-3.81 1.3,1.27, body extent -1.2,-3.62 1.2,1.06, height 8.4
HDR_1X6_2.54MM [mm] "Creator MM"
  rect 2x1.6 hole 1.1: 1(0,0)
  oval 2x1.6 hole 1.1: 2(0,-2.54) 3(0,-5.08) 4(0,-7.62) 5(0,-10.16) 6(0,-12.7)
  silkscreen extent -1.3,-13.97 1.3,1.27, body extent -1.2,-13.77 1.2,1.07, height 8.4
HVQFN33_7X7MM [mm] "Creator MM"
  rect 1.1x0.3 smd mask+0.06: 1(-3.35,2.275) 2(-3.35,1.625) 3(-3.35,0.975) 4(-3.35,0.325) 5(-3.35,-0.325) 6(-3.35,-0.975) 7(-3.35,-1.625) 8(-3.35,-2.275) 17(3.35,-2.275) 18(3.35,-1.625) 19(3.35,-0.975) 20(3.35,-0.325) 21(3.35,0.325) 22(3.35,0.975) 23(3.35,1.625) 24(3.35,2.275)
  rect 0.3x1.1 smd mask+0.06: 9(-2.275,-3.35) 10(-1.625,-3.35) 11(-0.975,-3.35) 12(-0.325,-3.35) 13(0.325,-3.35) 14(0.975,-3.35) 15(1.625,-3.35) 16(2.275,-3.35) 25(2.275,3.35) 26(1.625,3.35) 27(0.975,3.35) 28(0.325,3.35) 29(-0.325,3.35) 30(-0.975,3.35) 31(-1.625,3.35) 32(-2.275,3.35)
  rect 4.85x4.85 smd paste-10 mask+0.06: 33(0,0)
  silkscreen extent -3.6,-3.6 3.6,3.6, body extent -3.5,-3.5 3.5,3.5, height 1
IFSC_79MILX98MIL [mm] "Creator MM"
  rect 1.3x2.1 smd: 1(-1.05,0) 2(1.05,0)
  silkscreen extent -0.1,-1.1 0.1,1.1, body extent -1.3,-1 1.3,1, height 1.2
IHLP_118MILX144MIL [mm] "Creator MM"
  rect 1.5x1.2 smd: 1(-1.35,0) 2(1.35,0)
  silkscreen extent -1.9,-1.6 1.9,1.6, body extent -1.9,-1.5 1.9,1.5, height 1.5
IHLP_160MILX175MIL [mm] "Creator MM"
  rect 1.9x2.3 smd: 1(-1.9,0) 2(1.9,0)
  silkscreen extent -2.3,-2.2 2.3,2.2, body extent -2.3,-2.1 2.3,2.1, height 1.2
IHLP_204MILX216MIL [mm] "Creator MM"
  rect 2.115x2.79 smd: 1(-2.137,0) 2(2.138,0)
  silkscreen extent -2.9,-2.7 2.9,2.7, body extent -2.75,-2.6 2.75,2.6, height 3
L829-1J1T-43 [mil]
  round 60 hole 35.43: 1(-200,-305) 2(-120,-305) 3(-40,-305) 4(40,-305) 5(120,-305) 6(200,-305) 7(-240,-405) 8(-160,-405) 9(-80,-405) 10(80,-405) 11(160,-405) 12(240,-405)
  round 75 hole 51.18: 13(-296,205) 14(-296,305) 15(296,105) 16(296,205) 17(296,305)
  round 100 hole 63: 18(-346,-45) 19(346,-45)
  round 0 hole 129.92: ""(-190,-45) ""(190,-45)
  silkscreen extent -346,-475 346,475, body extent -401,-472 401,494, height 494
LED_0603 [mm]
  rect 0.8x0.8 smd: 1(-0.8,0) 2(0.8,0)
  silkscreen extent -1.78,-0.76 1.52,0.76, body extent -0.85,-0.4 0.85,0.4, height 0.66
MH_5MMD_2MMD [mm]
  round 5 / inner round 3.683 / far side round 5 hole 2: 1(0,0)
MH_7.4MMD_3.2MMD [mm]
  round 7.4 / inner round 3.683 / far side round 7.4 hole 3.2 mask+0.025: 1(0,0)
MICRO_SD_CARD [mm] ".Creator MM"
  body extent -8.65,-13.74 2.35,1.26, height 1.95
MICRO_SIM_CARD [mm] "Creator MM"
  body extent 0,-15 12,0, height 1.7
MINI_PCIE_52PIN_CARD_CON [mm] "Creator MM"
  rect 2x0.6 smd mask+0.05: 1(-4.1,-0.7) 2(4.1,-1.1) 3(-4.1,-1.5) 4(4.1,-1.9) 5(-4.1,-2.3) 6(4.1,-2.7) 7(-4.1,-3.1) 8(4.1,-3.5) 9(-4.1,-3.9) 10(4.1,-4.3) 11(-4.1,-4.7) 12(4.1,-5.1) 13(-4.1,-5.5) 14(4.1,-5.9) 15(-4.1,-6.3) 16(4.1,-6.7) 17(-4.1,-10.3) 18(4.1,-10.7) 19(-4.1,-11.1) 20(4.1,-11.5) 21(-4.1,-11.9) 22(4.1,-12.3) 23(-4.1,-12.7) 24(4.1,-13.1) 25(-4.1,-13.5) 26(4.1,-13.9) 27(-4.1,-14.3) 28(4.1,-14.7) 29(-4.1,-15.1) 30(4.1,-15.5) 31(-4.1,-15.9) 32(4.1,-16.3) 33(-4.1,-16.7) 34(4.1,-17.1) 35(-4.1,-17.5) 36(4.1,-17.9) 37(-4.1,-18.3) 38(4.1,-18.7) 39(-4.1,-19.1) 40(4.1,-19.5) 41(-4.1,-19.9) 42(4.1,-20.3) 43(-4.1,-20.7) 44(4.1,-21.1) 45(-4.1,-21.5) 46(4.1,-21.9) 47(-4.1,-22.3) 48(4.1,-22.7) 49(-4.1,-23.1) 50(4.1,-23.5) 51(-4.1,-23.9) 52(4.1,-24.3)
  rect 3.2x2.3 smd: 53(-3.5,2.15) 54(-3.5,-27.15)
  rrect70% 0x0 hole 1.6 unplated: 55(0,0)
  rrect70% 0x0 hole 1.1 unplated: 56(0,-25)
  silkscreen extent -5.1,-26.8 5.1,1.8, body extent -5,-27.35 5,2.35, height 5.95
MINI_PCIE_52PIN_CARD_LATCH [mm] "Creator MM"
  rect 2.7x1.2 smd mask+0.09: 1(-3.15,1.25) 2(-3.15,-1.25) 4(-3.15,-22.95) 5(-3.15,-25.45)
  rect 1.9x1.5 smd mask+0.09: 3(2.75,0) 6(2.75,-24.2)
  rrect70% 0x0 hole 1.55 mask+0.09: 7(0,0)
  rrect70% 0x0 hole 1.05 mask+0.09: 8(0,-24.2)
  silkscreen extent -3.35,-26.6 3.95,2.4, body extent -3.95,-26.6 3.95,2.4, height 6.7
"MINI_PCIE_FULL CARD" [mm] ".Creator MM"
  body extent 0,0 50.95,30, height 6.9
MLF_3X3_12PINS [mm]
  rect 0.48x0.23 smd mask+0.076: 1(-1.36,1.25) 2(-1.36,0.75) 3(-1.36,0.25) 4(-1.36,-0.25) 5(-1.36,-0.75) 6(-1.36,-1.25) 7(1.36,-1.25) 8(1.36,-0.75) 9(1.36,-0.25) 10(1.36,0.25) 11(1.36,0.75) 12(1.36,1.25)
  rect 1.8x1.125 smd mask+0.025: 13(0,0.699)
  rect 0.4x1.19 smd mask+0.076: 14(-0.77,-0.73)
  rect 0.9x1.19 smd mask+0.025: 15(0.45,-0.73)
  silkscreen extent -1.52,-1.65 1.52,2.1, body extent -1.52,-1.65 1.52,1.65, height 0.9
"MSOP8 _SMALLER" [mm]
  rect 1.04x0.38 smd mask+0.076: 1(-1.9,0.975) 2(-1.9,0.325) 3(-1.9,-0.325) 4(-1.9,-0.975) 5(1.9,-0.975) 6(1.9,-0.325) 7(1.9,0.325) 8(1.9,0.975)
  silkscreen extent -1.5,-1.6 1.5,1.6, body extent -1.5,-1.6 1.5,1.6, height 0.9
PBGA624 [mm] "Creator MM"
  round 0.4 smd mask+0.05: A2(-8.8,9.6) A3(-8,9.6) A4(-7.2,9.6) A5(-6.4,9.6) A6(-5.6,9.6) A7(-4.8,9.6) A8(-4,9.6) A9(-3.2,9.6) A10(-2.4,9.6) A11(-1.6,9.6) A12(-0.8,9.6) A13(0,9.6) A14(0.8,9.6) A15(1.6,9.6) A16(2.4,9.6) A17(3.2,9.6) A18(4,9.6) A19(4.8,9.6) A20(5.6,9.6) A21(6.4,9.6) A22(7.2,9.6) A23(8,9.6) A24(8.8,9.6) A25(9.6,9.6) AA1(-9.6,-6.4) AA2(-8.8,-6.4) AA3(-8,-6.4) AA4(-7.2,-6.4) AA5(-6.4,-6.4) AA6(-5.6,-6.4) AA7(-4.8,-6.4) AA8(-4,-6.4) AA9(-3.2,-6.4) AA10(-2.4,-6.4) AA11(-1.6,-6.4) AA12(-0.8,-6.4) AA13(0,-6.4) AA14(0.8,-6.4) AA15(1.6,-6.4) AA16(2.4,-6.4) AA17(3.2,-6.4) AA18(4,-6.4) AA19(4.8,-6.4) AA20(5.6,-6.4) AA21(6.4,-6.4) AA22(7.2,-6.4) AA23(8,-6.4) AA24(8.8,-6.4) AA25(9.6,-6.4) AB1(-9.6,-7.2) AB2(-8.8,-7.2) AB3(-8,-7.2) AB4(-7.2,-7.2) AB5(-6.4,-7.2) AB6(-5.6,-7.2) AB7(-4.8,-7.2) AB8(-4,-7.2) AB9(-3.2,-7.2) AB10(-2.4,-7.2) AB11(-1.6,-7.2) AB12(-0.8,-7.2) AB13(0,-7.2) AB14(0.8,-7.2) AB15(1.6,-7.2) AB16(2.4,-7.2) AB17(3.2,-7.2) AB18(4,-7.2) AB19(4.8,-7.2) AB20(5.6,-7.2) AB21(6.4,-7.2) AB22(7.2,-7.2) AB23(8,-7.2) AB24(8.8,-7.2) AB25(9.6,-7.2) AC1(-9.6,-8) AC2(-8.8,-8) AC3(-8,-8) AC4(-7.2,-8) AC5(-6.4,-8) AC6(-5.6,-8) AC7(-4.8,-8) AC8(-4,-8) AC9(-3.2,-8) AC10(-2.4,-8) AC11(-1.6,-8) AC12(-0.8,-8) AC13(0,-8) AC14(0.8,-8) AC15(1.6,-8) AC16(2.4,-8) AC17(3.2,-8) AC18(4,-8) AC19(4.8,-8) AC20(5.6,-8) AC21(6.4,-8) AC22(7.2,-8) AC23(8,-8) AC24(8.8,-8) AC25(9.6,-8) AD1(-9.6,-8.8) AD2(-8.8,-8.8) AD3(-8,-8.8) AD4(-7.2,-8.8) AD5(-6.4,-8.8) AD6(-5.6,-8.8) AD7(-4.8,-8.8) AD8(-4,-8.8) AD9(-3.2,-8.8) AD10(-2.4,-8.8) AD11(-1.6,-8.8) AD12(-0.8,-8.8) AD13(0,-8.8) AD14(0.8,-8.8) AD15(1.6,-8.8) AD16(2.4,-8.8) AD17(3.2,-8.8) AD18(4,-8.8) AD19(4.8,-8.8) AD20(5.6,-8.8) AD21(6.4,-8.8) AD22(7.2,-8.8) AD23(8,-8.8) AD24(8.8,-8.8) AD25(9.6,-8.8) AE1(-9.6,-9.6) AE2(-8.8,-9.6) AE3(-8,-9.6) AE4(-7.2,-9.6) AE5(-6.4,-9.6) AE6(-5.6,-9.6) AE7(-4.8,-9.6) AE8(-4,-9.6) AE9(-3.2,-9.6) AE10(-2.4,-9.6) AE11(-1.6,-9.6) AE12(-0.8,-9.6) AE13(0,-9.6) AE14(0.8,-9.6) AE15(1.6,-9.6) AE16(2.4,-9.6) AE17(3.2,-9.6) AE18(4,-9.6) AE19(4.8,-9.6) AE20(5.6,-9.6) AE21(6.4,-9.6) AE22(7.2,-9.6) AE23(8,-9.6) AE24(8.8,-9.6) AE25(9.6,-9.6) B1(-9.6,8.8) B2(-8.8,8.8) B3(-8,8.8) B4(-7.2,8.8) B5(-6.4,8.8) B6(-5.6,8.8) B7(-4.8,8.8) B8(-4,8.8) B9(-3.2,8.8) B10(-2.4,8.8) B11(-1.6,8.8) B12(-0.8,8.8) B13(0,8.8) B14(0.8,8.8) B15(1.6,8.8) B16(2.4,8.8) B17(3.2,8.8) B18(4,8.8) B19(4.8,8.8) B20(5.6,8.8) B21(6.4,8.8) B22(7.2,8.8) B23(8,8.8) B24(8.8,8.8) B25(9.6,8.8) C1(-9.6,8) C2(-8.8,8) C3(-8,8) C4(-7.2,8) C5(-6.4,8) C6(-5.6,8) C7(-4.8,8) C8(-4,8) C9(-3.2,8) C10(-2.4,8) C11(-1.6,8) C12(-0.8,8) C13(0,8) C14(0.8,8) C15(1.6,8) C16(2.4,8) C17(3.2,8) C18(4,8) C19(4.8,8) C20(5.6,8) C21(6.4,8) C22(7.2,8) C23(8,8) C24(8.8,8) C25(9.6,8) D1(-9.6,7.2) D2(-8.8,7.2) D3(-8,7.2) D4(-7.2,7.2) D5(-6.4,7.2) D6(-5.6,7.2) D7(-4.8,7.2) D8(-4,7.2) D9(-3.2,7.2) D10(-2.4,7.2) D11(-1.6,7.2) D12(-0.8,7.2) D13(0,7.2) D14(0.8,7.2) D15(1.6,7.2) D16(2.4,7.2) D17(3.2,7.2) D18(4,7.2) D19(4.8,7.2) D20(5.6,7.2) D21(6.4,7.2) D22(7.2,7.2) D23(8,7.2) D24(8.8,7.2) D25(9.6,7.2) E1(-9.6,6.4) E2(-8.8,6.4) E3(-8,6.4) E4(-7.2,6.4) E5(-6.4,6.4) E6(-5.6,6.4) E7(-4.8,6.4) E8(-4,6.4) E9(-3.2,6.4) E10(-2.4,6.4) E11(-1.6,6.4) E12(-0.8,6.4) E13(0,6.4) E14(0.8,6.4) E15(1.6,6.4) E16(2.4,6.4) E17(3.2,6.4) E18(4,6.4) E19(4.8,6.4) E20(5.6,6.4) E21(6.4,6.4) E22(7.2,6.4) E23(8,6.4) E24(8.8,6.4) E25(9.6,6.4) F1(-9.6,5.6) F2(-8.8,5.6) F3(-8,5.6) F4(-7.2,5.6) F5(-6.4,5.6) F6(-5.6,5.6) F7(-4.8,5.6) F8(-4,5.6) F9(-3.2,5.6) F10(-2.4,5.6) F11(-1.6,5.6) F12(-0.8,5.6) F13(0,5.6) F14(0.8,5.6) F15(1.6,5.6) F16(2.4,5.6) F17(3.2,5.6) F18(4,5.6) F19(4.8,5.6) F20(5.6,5.6) F21(6.4,5.6) F22(7.2,5.6) F23(8,5.6) F24(8.8,5.6) F25(9.6,5.6) G1(-9.6,4.8) G2(-8.8,4.8) G3(-8,4.8) G4(-7.2,4.8) G5(-6.4,4.8) G6(-5.6,4.8) G7(-4.8,4.8) G8(-4,4.8) G9(-3.2,4.8) G10(-2.4,4.8) G11(-1.6,4.8) G12(-0.8,4.8) G13(0,4.8) G14(0.8,4.8) G15(1.6,4.8) G16(2.4,4.8) G17(3.2,4.8) G18(4,4.8) G19(4.8,4.8) G20(5.6,4.8) G21(6.4,4.8) G22(7.2,4.8) G23(8,4.8) G24(8.8,4.8) G25(9.6,4.8) H1(-9.6,4) H2(-8.8,4) H3(-8,4) H4(-7.2,4) H5(-6.4,4) H6(-5.6,4) H7(-4.8,4) H8(-4,4) H9(-3.2,4) H10(-2.4,4) H11(-1.6,4) H12(-0.8,4) H13(0,4) H14(0.8,4) H15(1.6,4) H16(2.4,4) H17(3.2,4) H18(4,4) H19(4.8,4) H20(5.6,4) H21(6.4,4) H22(7.2,4) H23(8,4) H24(8.8,4) H25(9.6,4) J1(-9.6,3.2) J2(-8.8,3.2) J3(-8,3.2) J4(-7.2,3.2) J5(-6.4,3.2) J6(-5.6,3.2) J7(-4.8,3.2) J8(-4,3.2) J9(-3.2,3.2) J10(-2.4,3.2) J11(-1.6,3.2) J12(-0.8,3.2) J13(0,3.2) J14(0.8,3.2) J15(1.6,3.2) J16(2.4,3.2) J17(3.2,3.2) J18(4,3.2) J19(4.8,3.2) J20(5.6,3.2) J21(6.4,3.2) J22(7.2,3.2) J23(8,3.2) J24(8.8,3.2) J25(9.6,3.2) K1(-9.6,2.4) K2(-8.8,2.4) K3(-8,2.4) K4(-7.2,2.4) K5(-6.4,2.4) K6(-5.6,2.4) K7(-4.8,2.4) K8(-4,2.4) K9(-3.2,2.4) K10(-2.4,2.4) K11(-1.6,2.4) K12(-0.8,2.4) K13(0,2.4) K14(0.8,2.4) K15(1.6,2.4) K16(2.4,2.4) K17(3.2,2.4) K18(4,2.4) K19(4.8,2.4) K20(5.6,2.4) K21(6.4,2.4) K22(7.2,2.4) K23(8,2.4) K24(8.8,2.4) K25(9.6,2.4) L1(-9.6,1.6) L2(-8.8,1.6) L3(-8,1.6) L4(-7.2,1.6) L5(-6.4,1.6) L6(-5.6,1.6) L7(-4.8,1.6) L8(-4,1.6) L9(-3.2,1.6) L10(-2.4,1.6) L11(-1.6,1.6) L12(-0.8,1.6) L13(0,1.6) L14(0.8,1.6) L15(1.6,1.6) L16(2.4,1.6) L17(3.2,1.6) L18(4,1.6) L19(4.8,1.6) L20(5.6,1.6) L21(6.4,1.6) L22(7.2,1.6) L23(8,1.6) L24(8.8,1.6) L25(9.6,1.6) M1(-9.6,0.8) M2(-8.8,0.8) M3(-8,0.8) M4(-7.2,0.8) M5(-6.4,0.8) M6(-5.6,0.8) M7(-4.8,0.8) M8(-4,0.8) M9(-3.2,0.8) M10(-2.4,0.8) M11(-1.6,0.8) M12(-0.8,0.8) M13(0,0.8) M14(0.8,0.8) M15(1.6,0.8) M16(2.4,0.8) M17(3.2,0.8) M18(4,0.8) M19(4.8,0.8) M20(5.6,0.8) M21(6.4,0.8) M22(7.2,0.8) M23(8,0.8) M24(8.8,0.8) M25(9.6,0.8) N1(-9.6,0) N2(-8.8,0) N3(-8,0) N4(-7.2,0) N5(-6.4,0) N6(-5.6,0) N7(-4.8,0) N8(-4,0) N9(-3.2,0) N10(-2.4,0) N11(-1.6,0) N12(-0.8,0) N13(0,0) N14(0.8,0) N15(1.6,0) N16(2.4,0) N17(3.2,0) N18(4,0) N19(4.8,0) N20(5.6,0) N21(6.4,0) N22(7.2,0) N23(8,0) N24(8.8,0) N25(9.6,0) P1(-9.6,-0.8) P2(-8.8,-0.8) P3(-8,-0.8) P4(-7.2,-0.8) P5(-6.4,-0.8) P6(-5.6,-0.8) P7(-4.8,-0.8) P8(-4,-0.8) P9(-3.2,-0.8) P10(-2.4,-0.8) P11(-1.6,-0.8) P12(-0.8,-0.8) P13(0,-0.8) P14(0.8,-0.8) P15(1.6,-0.8) P16(2.4,-0.8) P17(3.2,-0.8) P18(4,-0.8) P19(4.8,-0.8) P20(5.6,-0.8) P21(6.4,-0.8) P22(7.2,-0.8) P23(8,-0.8) P24(8.8,-0.8) P25(9.6,-0.8) R1(-9.6,-1.6) R2(-8.8,-1.6) R3(-8,-1.6) R4(-7.2,-1.6) R5(-6.4,-1.6) R6(-5.6,-1.6) R7(-4.8,-1.6) R8(-4,-1.6) R9(-3.2,-1.6) R10(-2.4,-1.6) R11(-1.6,-1.6) R12(-0.8,-1.6) R13(0,-1.6) R14(0.8,-1.6) R15(1.6,-1.6) R16(2.4,-1.6) R17(3.2,-1.6) R18(4,-1.6) R19(4.8,-1.6) R20(5.6,-1.6) R21(6.4,-1.6) R22(7.2,-1.6) R23(8,-1.6) R24(8.8,-1.6) R25(9.6,-1.6) T1(-9.6,-2.4) T2(-8.8,-2.4) T3(-8,-2.4) T4(-7.2,-2.4) T5(-6.4,-2.4) T6(-5.6,-2.4) T7(-4.8,-2.4) T8(-4,-2.4) T9(-3.2,-2.4) T10(-2.4,-2.4) T11(-1.6,-2.4) T12(-0.8,-2.4) T13(0,-2.4) T14(0.8,-2.4) T15(1.6,-2.4) T16(2.4,-2.4) T17(3.2,-2.4) T18(4,-2.4) T19(4.8,-2.4) T20(5.6,-2.4) T21(6.4,-2.4) T22(7.2,-2.4) T23(8,-2.4) T24(8.8,-2.4) T25(9.6,-2.4) U1(-9.6,-3.2) U2(-8.8,-3.2) U3(-8,-3.2) U4(-7.2,-3.2) U5(-6.4,-3.2) U6(-5.6,-3.2) U7(-4.8,-3.2) U8(-4,-3.2) U9(-3.2,-3.2) U10(-2.4,-3.2) U11(-1.6,-3.2) U12(-0.8,-3.2) U13(0,-3.2) U14(0.8,-3.2) U15(1.6,-3.2) U16(2.4,-3.2) U17(3.2,-3.2) U18(4,-3.2) U19(4.8,-3.2) U20(5.6,-3.2) U21(6.4,-3.2) U22(7.2,-3.2) U23(8,-3.2) U24(8.8,-3.2) U25(9.6,-3.2) V1(-9.6,-4) V2(-8.8,-4) V3(-8,-4) V4(-7.2,-4) V5(-6.4,-4) V6(-5.6,-4) V7(-4.8,-4) V8(-4,-4) V9(-3.2,-4) V10(-2.4,-4) V11(-1.6,-4) V12(-0.8,-4) V13(0,-4) V14(0.8,-4) V15(1.6,-4) V16(2.4,-4) V17(3.2,-4) V18(4,-4) V19(4.8,-4) V20(5.6,-4) V21(6.4,-4) V22(7.2,-4) V23(8,-4) V24(8.8,-4) V25(9.6,-4) W1(-9.6,-4.8) W2(-8.8,-4.8) W3(-8,-4.8) W4(-7.2,-4.8) W5(-6.4,-4.8) W6(-5.6,-4.8) W7(-4.8,-4.8) W8(-4,-4.8) W9(-3.2,-4.8) W10(-2.4,-4.8) W11(-1.6,-4.8) W12(-0.8,-4.8) W13(0,-4.8) W14(0.8,-4.8) W15(1.6,-4.8) W16(2.4,-4.8) W17(3.2,-4.8) W18(4,-4.8) W19(4.8,-4.8) W20(5.6,-4.8) W21(6.4,-4.8) W22(7.2,-4.8) W23(8,-4.8) W24(8.8,-4.8) W25(9.6,-4.8) Y1(-9.6,-5.6) Y2(-8.8,-5.6) Y3(-8,-5.6) Y4(-7.2,-5.6) Y5(-6.4,-5.6) Y6(-5.6,-5.6) Y7(-4.8,-5.6) Y8(-4,-5.6) Y9(-3.2,-5.6) Y10(-2.4,-5.6) Y11(-1.6,-5.6) Y12(-0.8,-5.6) Y13(0,-5.6) Y14(0.8,-5.6) Y15(1.6,-5.6) Y16(2.4,-5.6) Y17(3.2,-5.6) Y18(4,-5.6) Y19(4.8,-5.6) Y20(5.6,-5.6) Y21(6.4,-5.6) Y22(7.2,-5.6) Y23(8,-5.6) Y24(8.8,-5.6) Y25(9.6,-5.6)
  silkscreen extent -10.6,-10.6 10.6,10.6, body extent -10.5,-10.5 10.5,10.5, height 1.1
POWER_JACK_5.5_2.1MM_NS_V1.1 [mm] "Creator MM. v1.1 - changed holes for slots"
  oval 5x4 hole 1 slot 3.7 at 0 deg: 1(0,0)
  oval 5x4 hole 1 slot 3.2 at 0 deg: 2(0,6)
  oval 4x5 hole 1 slot 3.2 at 90 deg: 3(-4.7,3)
  silkscreen extent -4.65,-0.85 4.65,19.85, body extent -4.9,-0.7 4.5,13.7, height 11.02
QFN16_3X3MM [mm] "Creator MM"
  rect 0.8x0.3 smd mask+0.03: 1(-1.275,1) 2(-1.275,0.5) 3(-1.275,0) 4(-1.275,-0.5) 5(-1.275,-1) 9(1.275,-1) 10(1.275,-0.5) 11(1.275,0) 12(1.275,0.5) 13(1.275,1)
  rect 0.3x0.8 smd mask+0.03: 6(-0.5,-1.275) 7(0,-1.275) 8(0.5,-1.275) 14(0.5,1.275) 15(0,1.275) 16(-0.5,1.275)
  silkscreen extent -1.9,-1.6 1.6,1.6, body extent -1.5,-1.5 1.5,1.5, height 1.02
QFN24_4X4MM [mm] "Creator MM"
  rect 1x0.3 smd mask+0.03: 1(-1.875,1.5) 2(-1.875,1) 3(-1.875,0.5) 4(-1.875,0) 5(-1.875,-0.5) 6(-1.875,-1) 7(-1.875,-1.5) 13(1.875,-1.5) 14(1.875,-1) 15(1.875,-0.5) 16(1.875,0) 17(1.875,0.5) 18(1.875,1) 19(1.875,1.5)
  rect 0.3x1 smd mask+0.03: 8(-1,-1.875) 9(-0.5,-1.875) 10(0,-1.875) 11(0.5,-1.875) 12(1,-1.875) 20(1,1.875) 21(0.5,1.875) 22(0,1.875) 23(-0.5,1.875) 24(-1,1.875)
  silkscreen extent -2.7,-2.1 2.1,2.2, body extent -2,-2 2,2, height 1.05
"QFN32 5x5x0.85_V1.1" [mm] "Updated pads length and overlay."
  rect 0.83x0.3 smd mask+0.025: 1(-2.46,1.75) 2(-2.46,1.25) 3(-2.46,0.75) 4(-2.46,0.25) 5(-2.46,-0.25) 6(-2.46,-0.75) 7(-2.46,-1.25) 8(-2.46,-1.75) 17(2.46,-1.75) 18(2.46,-1.25) 19(2.46,-0.75) 20(2.46,-0.25) 21(2.46,0.25) 22(2.46,0.75) 23(2.46,1.25) 24(2.46,1.75)
  rect 0.3x0.83 smd mask+0.025: 9(-1.75,-2.46) 10(-1.25,-2.46) 11(-0.75,-2.46) 12(-0.25,-2.46) 13(0.25,-2.46) 14(0.75,-2.46) 15(1.25,-2.46) 16(1.75,-2.46) 25(1.75,2.46) 26(1.25,2.46) 27(0.75,2.46) 28(0.25,2.46) 29(-0.25,2.46) 30(-0.75,2.46) 31(-1.25,2.46) 32(-1.75,2.46)
  rect 3.5x3.5 smd paste-10 mask+0.025: 33(0,0)
  silkscreen extent -2.6,-2.6 2.6,2.6, body extent -2.5,-2.5 2.5,2.5, height 0.9
QFN36_6MMX6MM [mm] "Creator MM"
  rect 1x0.28 smd mask+0.025: 1(-2.8,2) 2(-2.8,1.5) 3(-2.8,1) 4(-2.8,0.5) 5(-2.8,0) 6(-2.8,-0.5) 7(-2.8,-1) 8(-2.8,-1.5) 9(-2.8,-2) 19(2.8,-2) 20(2.8,-1.5) 21(2.8,-1) 22(2.8,-0.5) 23(2.8,0) 24(2.8,0.5) 25(2.8,1) 26(2.8,1.5) 27(2.8,2)
  rect 0.28x1 smd mask+0.025: 10(-2,-2.8) 11(-1.5,-2.8) 12(-1,-2.8) 13(-0.5,-2.8) 14(0,-2.8) 15(0.5,-2.8) 16(1,-2.8) 17(1.5,-2.8) 18(2,-2.8) 28(2,2.8) 29(1.5,2.8) 30(1,2.8) 31(0.5,2.8) 32(0,2.8) 33(-0.5,2.8) 34(-1,2.8) 35(-1.5,2.8) 36(-2,2.8)
  rect 3.7x3.7 smd paste-10 mask+0.025: 37(0,0)
  silkscreen extent -3.1,-3.1 3.1,3.1, body extent -3.1,-3.1 3.1,3.1, height 0.9
QFN48_SMALL_EP_7MMX7MM [mm] "Creator MM"
  rect 0.7x0.25 smd mask+0.03: 1(-3.44,2.75) 2(-3.44,2.25) 3(-3.44,1.75) 4(-3.44,1.25) 5(-3.44,0.75) 6(-3.44,0.25) 7(-3.44,-0.25) 8(-3.44,-0.75) 9(-3.44,-1.25) 10(-3.44,-1.75) 11(-3.44,-2.25) 12(-3.44,-2.75) 25(3.44,-2.75) 26(3.44,-2.25) 27(3.44,-1.75) 28(3.44,-1.25) 29(3.44,-0.75) 30(3.44,-0.25) 31(3.44,0.25) 32(3.44,0.75) 33(3.44,1.25) 34(3.44,1.75) 35(3.44,2.25) 36(3.44,2.75)
  rect 0.25x0.7 smd mask+0.03: 13(-2.75,-3.44) 14(-2.25,-3.44) 15(-1.75,-3.44) 16(-1.25,-3.44) 17(-0.75,-3.44) 18(-0.25,-3.44) 19(0.25,-3.44) 20(0.75,-3.44) 21(1.25,-3.44) 22(1.75,-3.44) 23(2.25,-3.44) 24(2.75,-3.44) 37(2.75,3.44) 38(2.25,3.44) 39(1.75,3.44) 40(1.25,3.44) 41(0.75,3.44) 42(0.25,3.44) 43(-0.25,3.44) 44(-0.75,3.44) 45(-1.25,3.44) 46(-1.75,3.44) 47(-2.25,3.44) 48(-2.75,3.44)
  rect 3.6x3.6 smd paste-10 mask+0.025: 49(0,0)
  silkscreen extent -3.6,-3.6 3.6,3.6, body extent -3.51,-3.51 3.51,3.51, height 0.78
R0201 [mm] "Creator MM"
  rect 0.3x0.3 smd mask+0.04: 1(-0.265,0) 2(0.265,0)
  silkscreen extent -0.6,-0.3 0.6,0.3, body extent -0.3,-0.15 0.3,0.15, height 0.32
R0402 [mm]
  rect 0.5x0.6 smd: 1(-0.5,0) 2(0.5,0)
  silkscreen extent -1,-0.6 1,0.6, body extent -0.5,-0.25 0.5,0.25, height 0.4
R0805_SMALL [mm] "Creator MM"
  rect 0.6x1.3 smd paste-0.3 mask-0.3: 1(-1,0) 2(1,0)
  silkscreen extent -1.65,-1.02 1.65,1.02, body extent -1,-0.6 1,0.6, height 0.7
R1206 [mm]
  rect 0.9x1.6 smd: 1(-1.45,0) 2(1.45,0)
  silkscreen extent -2.16,-1.14 2.16,1.14, body extent -1.6,-0.8 1.6,0.8, height 0.84
"RGY (R-PVQFN-N16)" [mm] "Creator MM"
  rect 0.9x0.28 smd mask+0.06: 1(-1.95,-0.75) 8(1.95,-0.75) 9(1.95,0.75) 16(-1.95,0.75)
  rect 0.28x0.9 smd mask+0.06: 2(-1.25,-1.7) 3(-0.75,-1.7) 4(-0.25,-1.7) 5(0.25,-1.7) 6(0.75,-1.7) 7(1.25,-1.7) 10(1.25,1.7) 11(0.75,1.7) 12(0.25,1.7) 13(-0.25,1.7) 14(-0.75,1.7) 15(-1.25,1.7)
  rect 2.55x2.05 smd paste-10 mask+0.06: 17(0,0)
  silkscreen extent -2.5,-1.9 2.1,1.9, body extent -2,-1.75 2,1.75, height 0.84
SATA_VERTICAL [mm]
  round 1.3 hole 0.74: 1(0,0) 4(-3.81,0) 7(-7.62,0)
  oval 1.07x1.3 hole 0.74: 2(-1.27,1) 3(-2.54,1) 5(-5.08,1) 6(-6.35,1)
  round 2 hole 1.35: 8(2.67,0.5) 9(-10.29,0.5)
  silkscreen extent -12.51,-2.6 4.49,3.9, body extent -12.43,-2.55 4.47,3.9, height 8.43